# Altium PCB 400921.PcbDoc (part 1 of 3)
Units mm, origin at the board's own origin, x right, y up, seen from the top; angles counter-clockwise.
Board outline 33 x 32.99 mm, 4 copper layers (Top Layer, Mid-Layer 1, Mid-Layer 2, Bottom Layer), stack 0.75 mm thick; 113 components, 68 nets, 329 pads, 369 vias.
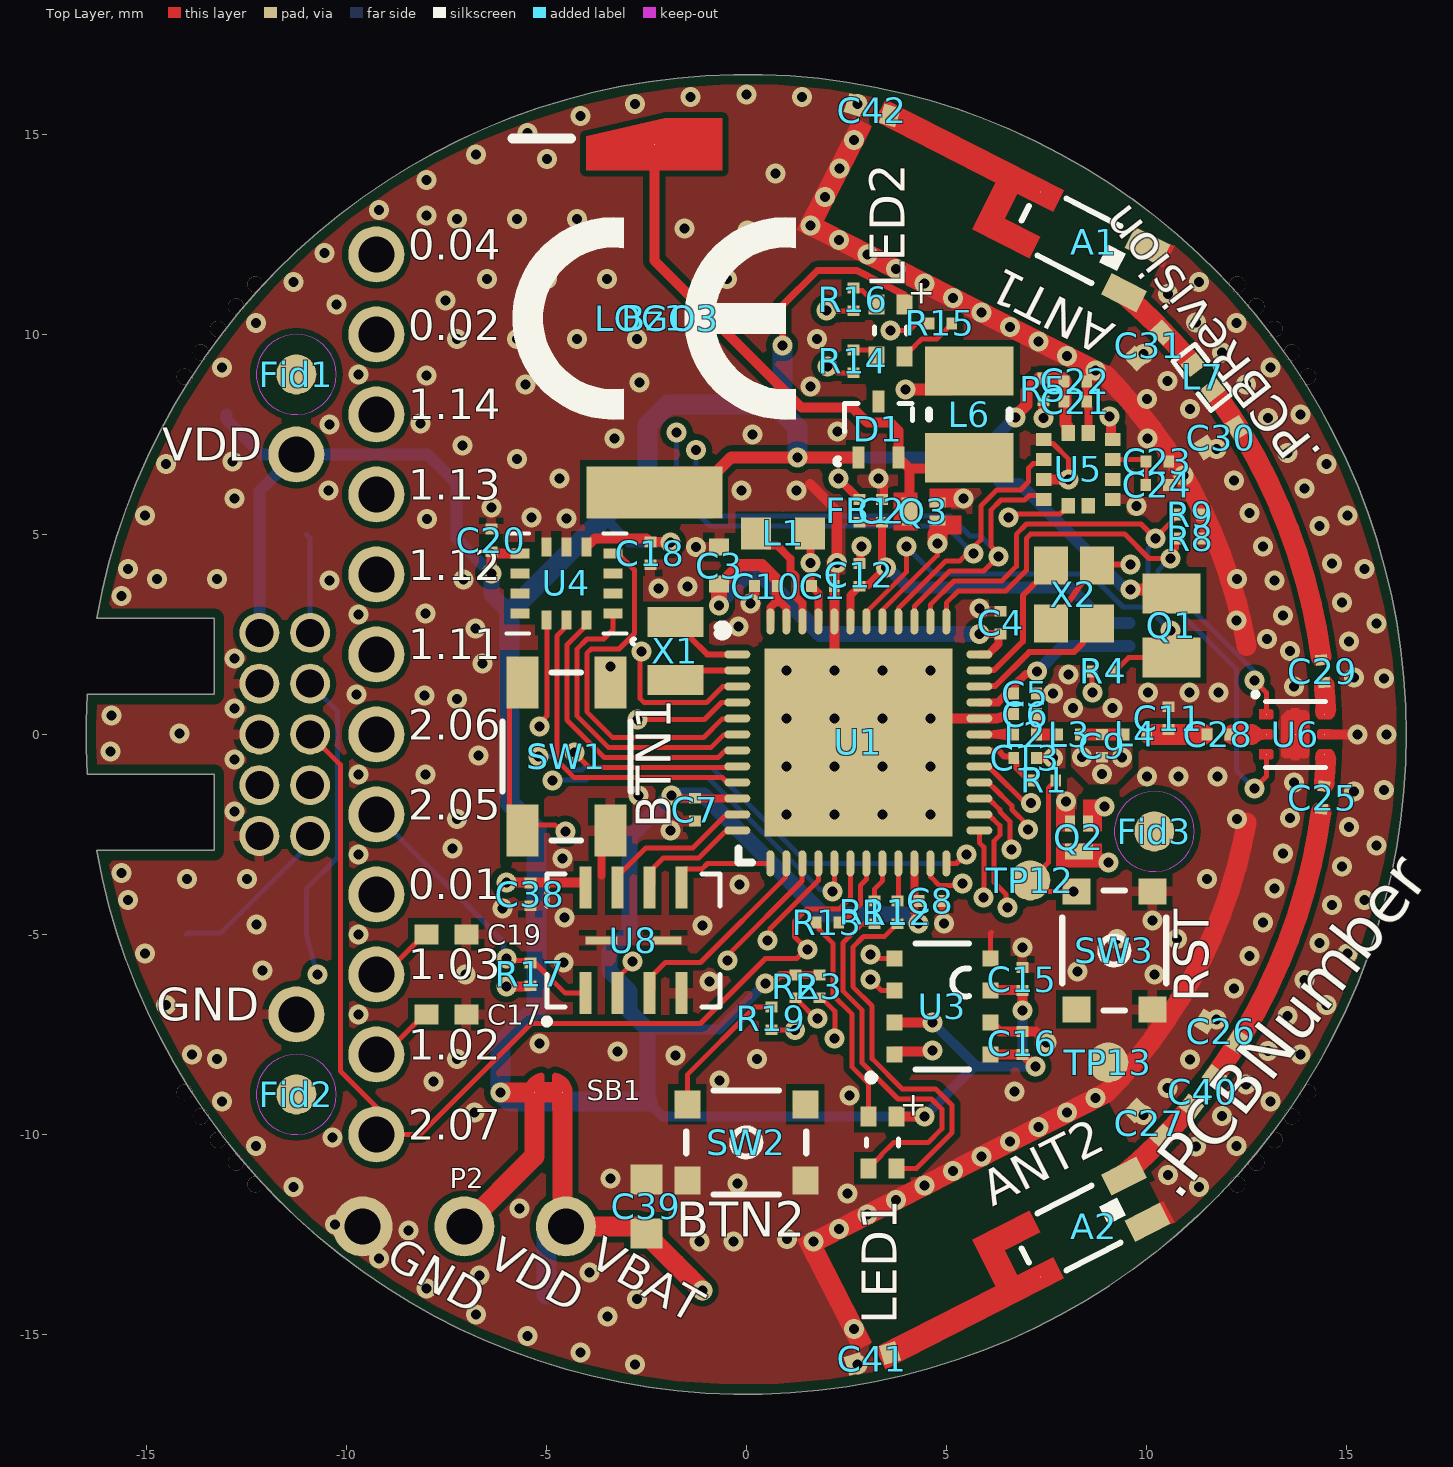
[diagram p0: Top Layer view]
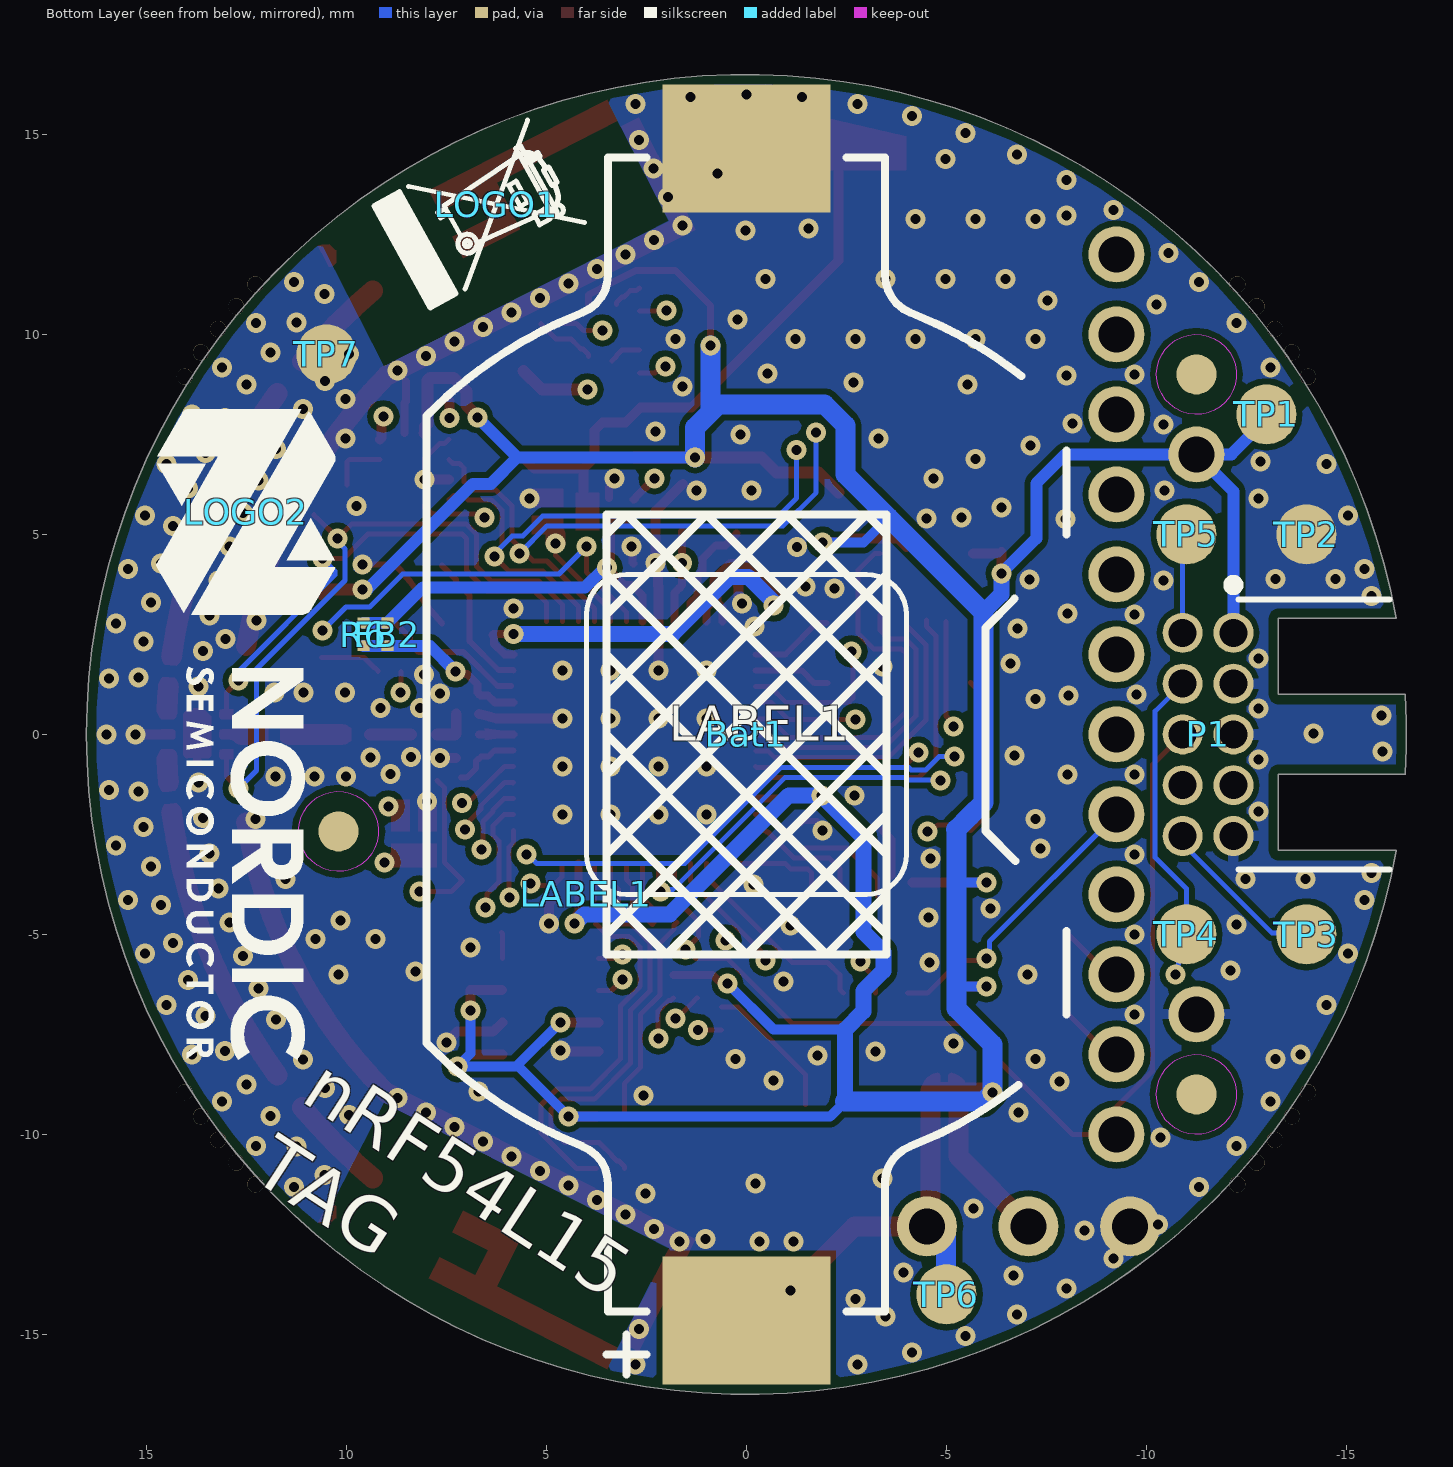
[diagram p1: Bottom Layer view, seen from below]
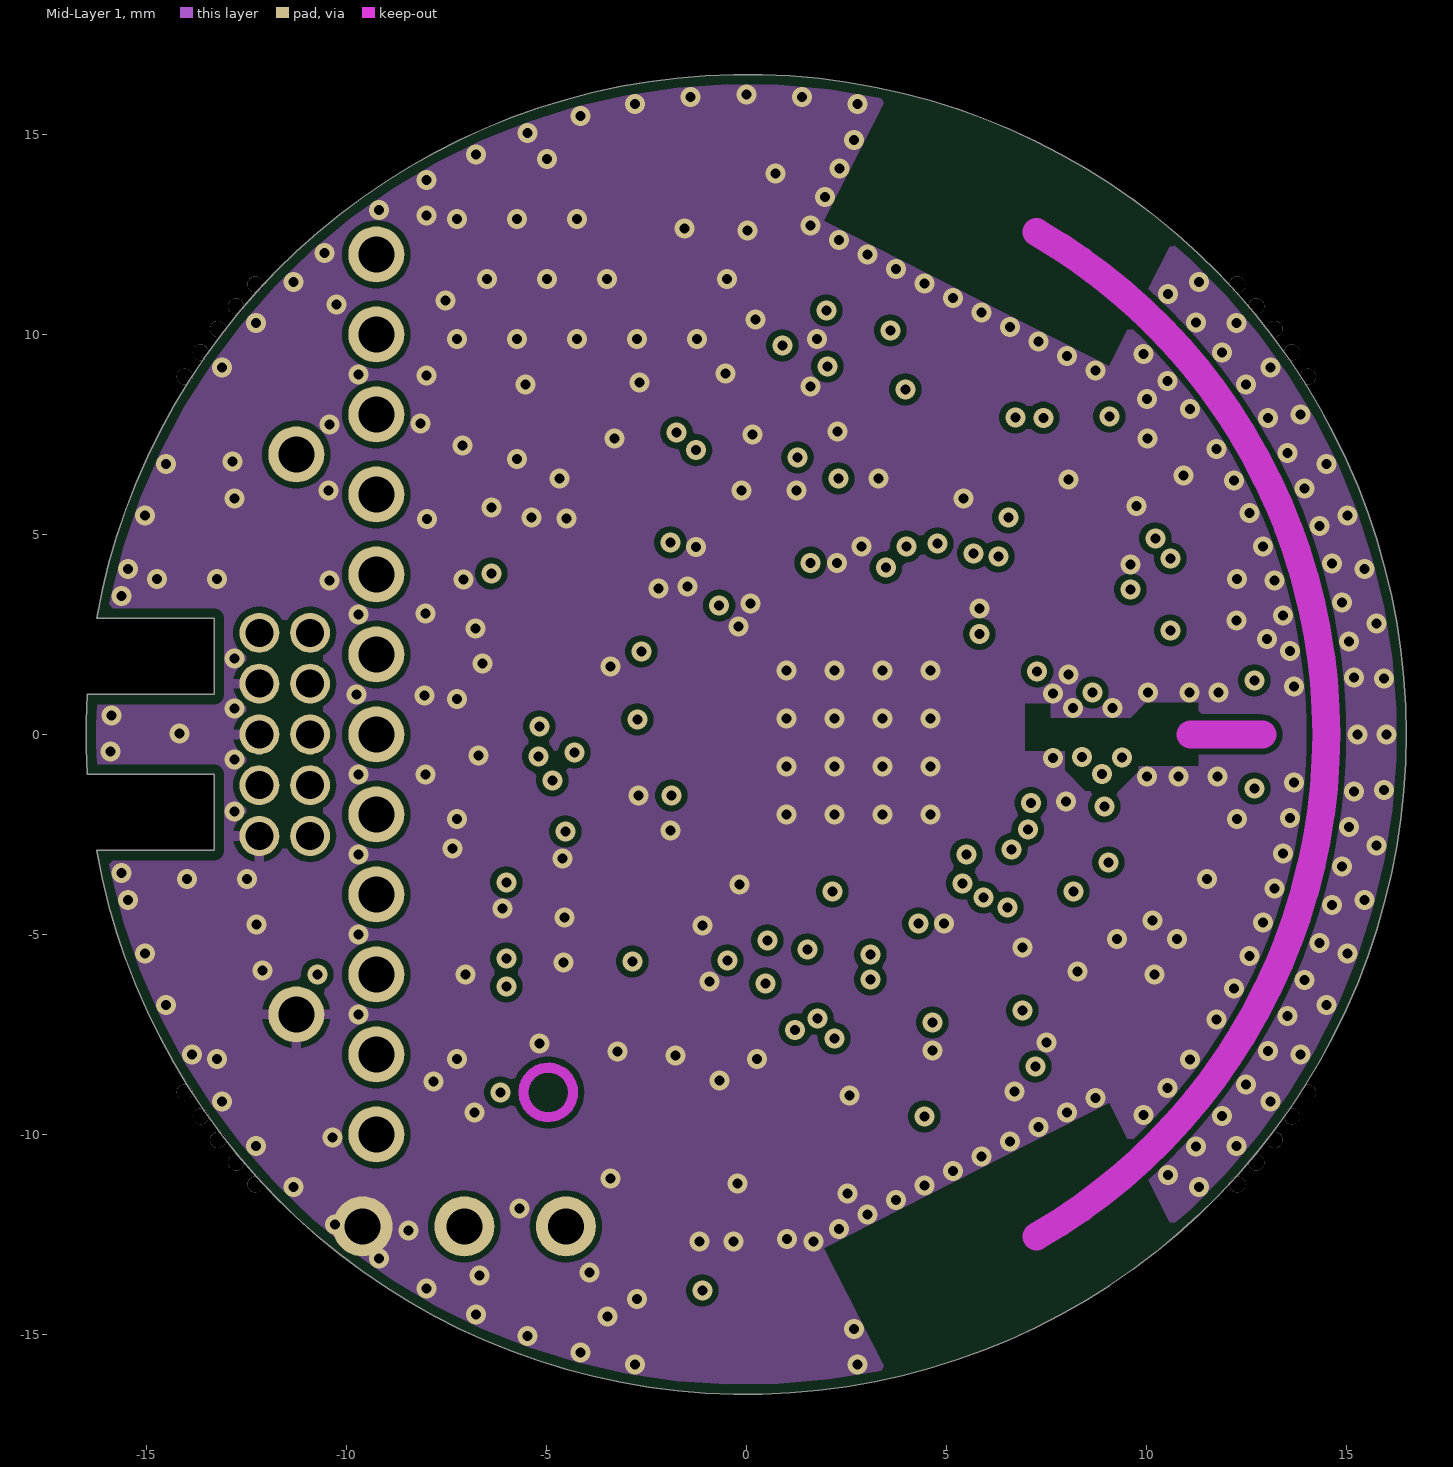
[diagram p2: Mid-Layer 1]
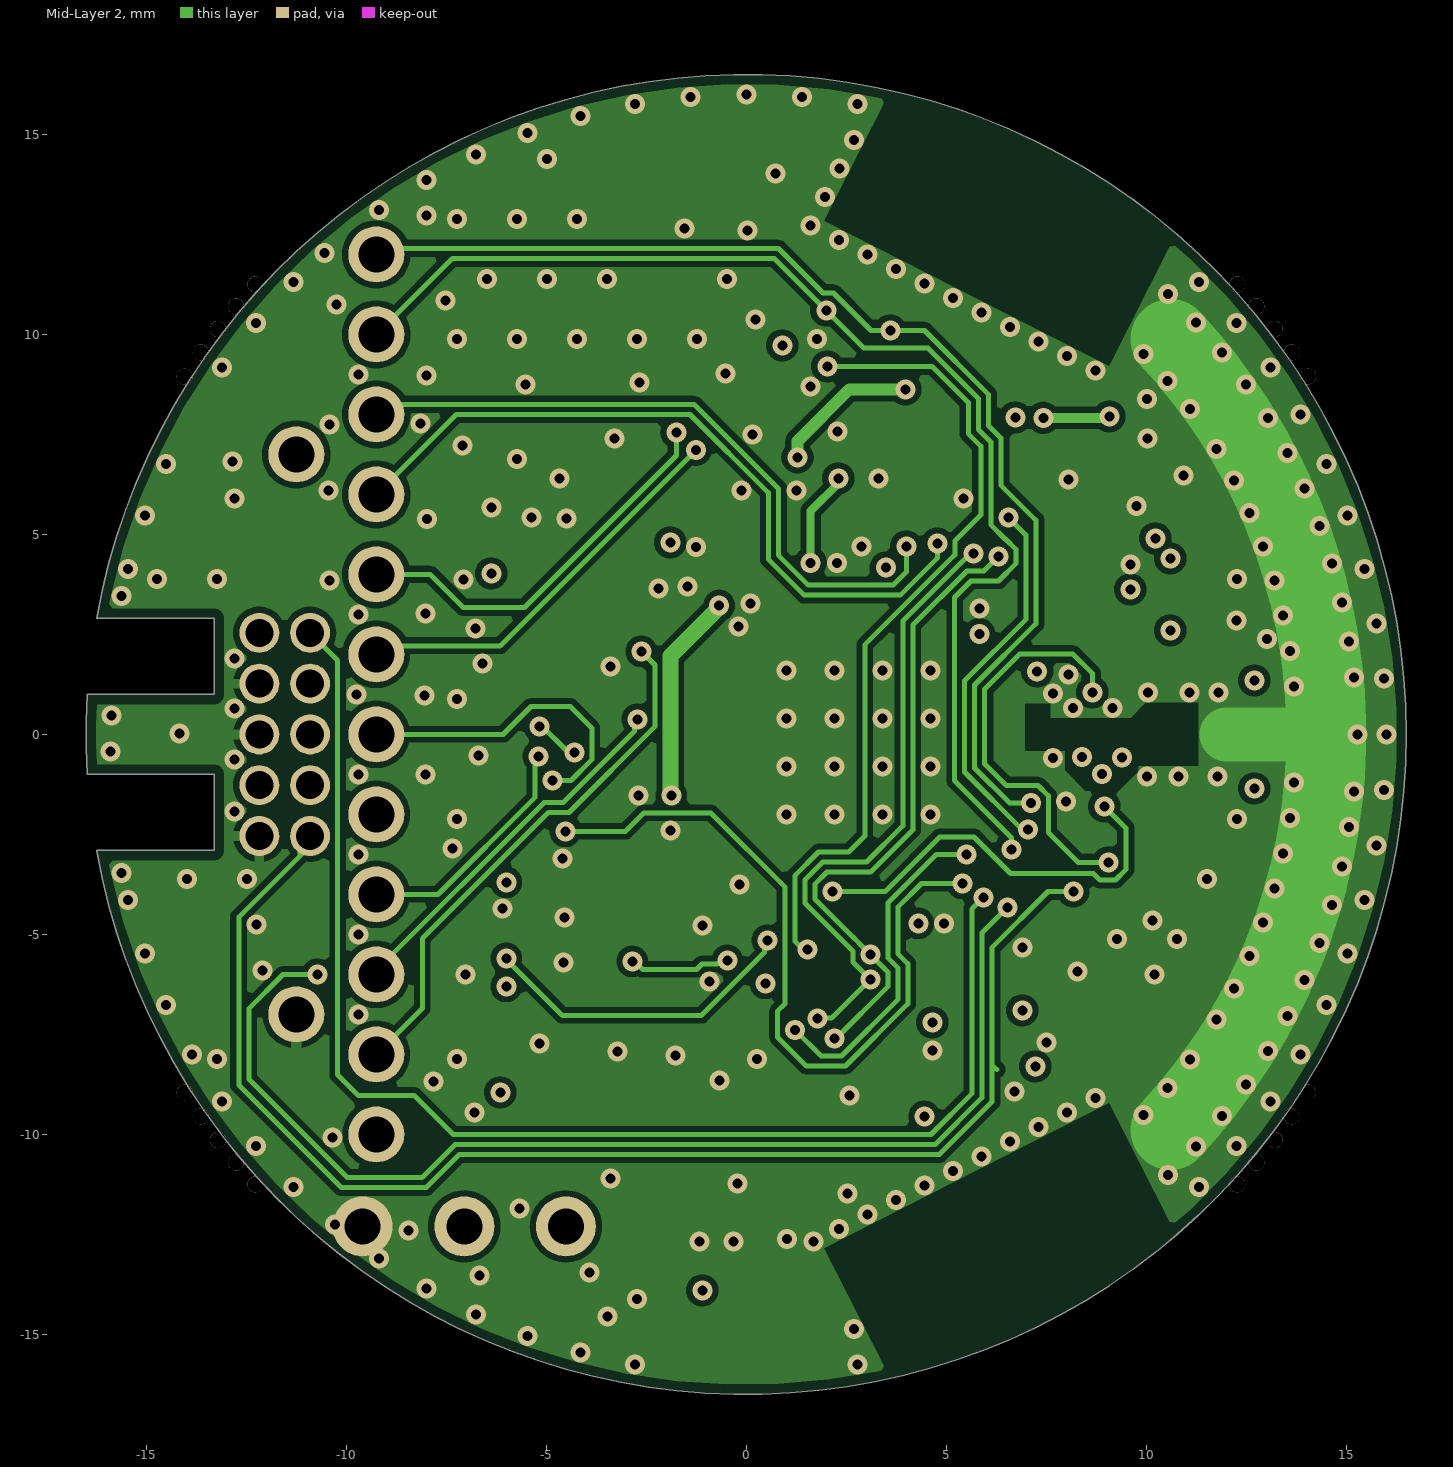
[diagram p3: Mid-Layer 2]

## Layer stack, top to bottom
Top Solder: solder mask 0.0304, Solder Resist Halogen-Free, Dk 3.8
Top Layer: signal copper 0.035
Dielectric1: prepreg 0.09, FR-4 Halogen-Free, Dk 4.2
Mid-Layer 1: signal copper 0.035
Dielectric2: core 0.43, FR-4 Halogen-Free, Dk 4.2
Mid-Layer 2: signal copper 0.035
Dielectric3: prepreg 0.09, FR-4 Halogen-Free, Dk 4.2
Bottom Layer: signal copper 0.035
Bottom Solder: solder mask 0.0304, Solder Resist Halogen-Free, Dk 3.8

## Board outline
-16.47,-1 -13.3,-1 -13.3,-2.9 -16.243,-2.9 ccw(c0,0) -16.243,2.9 -13.3,2.9 -13.3,1 -16.47,1 ccw(c-0.001,0)

## Design rules (kind name [scope] priority, off if disabled: settings)
BoardOutlineClearance BoardOutlineClearance_1 [HasFootprint('L-KLS5-CR2032-23-B1')] p1: gap=0.1 ignorepadtopadclearanceinfootprint=FALSE
BoardOutlineClearance [(OnLayer('Top Layer') OR OnLayer('Mid-Layer 1') OR OnLayer('Mid-Layer 2') OR OnLayer('Bottom Layer'))] p2: gap=0.25 ignorepadtopadclearanceinfootprint=FALSE except(0: Text-OutlineEdge Text-CavityEdge Text-CutoutEdge Text-SplitBarrior Text-SplitContinuation)
Clearance NPTH_Clearance [Not PadIsPlated And OnLayer('Multi-Layer')] p1: gap=0.175 ignorepadtopadclearanceinfootprint=FALSE
Clearance ANT_Clerance [InNet('ANT')] p2: gap=0.127 ignorepadtopadclearanceinfootprint=FALSE except(0: Arc-Hole Track-Hole SMDPad-Hole THPad-Hole Via-Hole Fill-Hole Poly-Hole Region-Hole Text-Hole)
Clearance Polygon_Clearance [(InNamedPolygon('Top_Layer-GND')) or (InNamedPolygon('Bottom_Layer-GND')) or (InNamedPolygon('Mid_Layer_1-GND')) or (InNamedPolygon('Mid_Layer_2-GND'))] p3: gap=0.15 ignorepadtopadclearanceinfootprint=FALSE
Clearance [All] p4: gap=0.125 ignorepadtopadclearanceinfootprint=FALSE
ComponentClearance [All] p1 off: gap=0.254 collisioncheckmode=3 verticalgap=0.254 showdistances=FALSE
DiffPairsRouting [All] p1: maxlimit=0.254 minlimit=0.15 mostfreqgap=0.254 toplayer_maxgap=0.15 toplayer_prefgap=0.15 toplayer_minwidth=0.381 toplayer_maxwidth=0.381 toplayer_prefwidth=0.381 midlayer1_mingap=0.254 midlayer1_minwidth=0.381 midlayer1_maxwidth=0.381 midlayer1_prefwidth=0.381 midlayer2_mingap=0.254 midlayer2_minwidth=0.381 midlayer2_maxwidth=0.381 midlayer2_prefwidth=0.381 bottomlayer_maxgap=0.15 bottomlayer_prefgap=0.15 bottomlayer_minwidth=0.381 bottomlayer_maxwidth=0.381 bottomlayer_prefwidth=0.381 maxuncoupledlength=12.7
FabricationTestPointUsage TestPointUsage [All] p1: valid=0 allowmultiple=FALSE
FabricationTestpoint Testpoint [All] p1: side=3 testpointundercomponent=TRUE minsize=1.016 maxsize=2.54 preferedsize=1.524 minholesize=0 maxholesize=1.016 preferedholesize=0.813 testpointgrid=0.025 allowsidetop=TRUE allowsidebottom=TRUE usegrid=TRUE gridtolerance=0
Height [All] p1 off: minheight=0 maxheight=25.4 prefheight=12.7
HoleSize [All] p1: absolutevalues=TRUE maxlimit=5 minlimit=0.25 maxpercent=80.000 minpercent=20.000
MinimumAnnularRing [All] p1 off: minimumring=0.152
PolygonConnect PolygonConnect_1 [isVia and innet(gnd)] p1: connectstyle=Direct reliefconductorwidth=0.254 reliefentries=4 polygonreliefangle="90 Angle" airgapwidth=0.254
PolygonConnect [All] p2: connectstyle=Relief reliefconductorwidth=0.254 reliefentries=4 polygonreliefangle="90 Angle" airgapwidth=0.15
RoutingVias [All] p1: holewidth=0.25 width=0.5 viastyle="Through Hole" minholewidth=0.2 minwidth=0.4 maxholewidth=0.711 maxwidth=1.27
SilkToSolderMaskClearance SilkscreenOverComponentPads [IsPad] p1: minsilkscreentomaskgap=0.254 clearancetoexposedcopper=TRUE
SolderMaskExpansion SolderMaskExpansion_via [IsVia] p1: expansion=0.076 istentingtop=TRUE
SolderMaskExpansion [All] p2: expansion=0.076 istentingtop=FALSE
SupplyNets "Schematic Supply Nets_9" [InNet('GND')] p1: voltage=0.000
Width Width_RF [InNetClass('RF')] p1: maxlimit=0.517 minlimit=0.076 preferedwidth=0.517 toplayer_minwidth=0.517 midlayer1_maxwidth=0.076 midlayer1_prefwidth=0.078 midlayer2_maxwidth=0.076 midlayer2_prefwidth=0.078 bottomlayer_minwidth=0.517 impedanceprofiledriven=TRUE impedanceprofileid={737E912B-4C07-4FB1-81E6-55882BF422C1} impedanceprofilevalue=50.000000 minimp=50.000000 maximp=50.000000 favimp=50.000000
Width [All] p2: maxlimit=2.54 minlimit=0.125 preferedwidth=0.15
23 further rules are at their usual default settings.

## Classes and differential pairs
net class GPIO: P0.00 P0.01 P0.02 P0.04 P2.07 P2.08 P2.09 P2.10
component class Sensors: C15 C16 C18 C20 C21 C22 C23 C24 Q1 Q2 R2 R3 R4 R5 U3 U4 U5
component class RFFE: A1 A2 C25 C26 C27 C28 C29 C30 C31 C40 C41 C42 L7 R7 R8 R9 U6
component class nRF54L15: 0.01 0.02 0.04 1.02 1.03 1.11 1.12 1.13 1.14 2.05 2.06 2.07 C1 C2 C3 C4 C5 C6 C7 C8 C9 C10 C11 C12 C13 C17 C19 FB1 FB2 GND L1 L2 L3 L4 R1 R6 TP1 TP2 TP3 TP4 TP5 U1 VDD X1 X2
component class Misc: Bat1 Bz1 C38 C39 D1 L6 LED1 LED2 P1 P2 Q3 R11 R12 R13 R14 R15 R16 R17 R19 SB1 SW1 SW2 SW3 TP6 TP7 TP12 TP13 U8
net class SWD_nRF54: P2.07 RESET SWDCLK SWDIO
net class RF: ANT1 ANT2 J1 J2 NetA1_1 NetA2_1 RF RFC
net class QSPI: P2.00 P2.01 P2.02 P2.03 P2.04 P2.05

## Components (designator, comment, footprint, x,y, rotation, side; value= is the part's Value field where it differs from the comment)
0.01 "TP" TESTPAD-TH -9.25,-4 r270 top
0.02 "TP" TESTPAD-TH -9.25,10 r270 top
0.04 "TP" TESTPAD-TH -9.25,12 r270 top
1.02 "TP" TESTPAD-TH -9.25,-8 r270 top
1.03 "TP" TESTPAD-TH -9.25,-6 r270 top
1.11 "TP" TESTPAD-TH -9.25,2 r270 top
1.12 "TP" TESTPAD-TH -9.25,4 r270 top
1.13 "TP" TESTPAD-TH -9.25,6 r270 top
1.14 "TP" TESTPAD-TH -9.25,8 r270 top
2.05 "TP" TESTPAD-TH -9.25,-2 r270 top
2.06 "TP" TESTPAD-TH -9.25,0 r270 top
2.07 "TP" TESTPAD-TH -9.25,-10 r270 top
A1 "2450AT18D0100" 2450AT18D0100_TE-R 8.4,12.3 r333 top
A2 "2450AT18D0100" 2450AT18D0100_TE-L 8.4,-12.3 r207 top
Bat1 "Bat Holder CR2032" L-KLS5-CR2032-23-B1 0,0 r90 bottom locked
Bz1 "Piezo_4kHz" Buzzer_PKMCS0909 -2.3,10.4 r90 top
C1 "2.2µF" CAPC0603X03L_C 1.915,3.709 r180 top
C2 "2.2µF" CAPC0603X03L_C 3.388,5.587 r270 top
C3 "10µF" CAPC1005X04L_C2 -0.677,4.223 r270 top
C4 "100nF" CAPC0603X03L_C 6.358,2.793 r90 top
C5 "100pF" CAPC0603X03L_C 6.968,1.019 r180 top
C6 "1.5pF" CAPC0603X03L_C 6.968,0.507 r0 top
C7 "100nF" CAPC0603X03L_C -1.287,-1.881 r270 top
C8 "100nF" CAPC0603X03L_C 4.604,-4.162 r0 top
C9 "2.0pF" CAPC0603X03L_C 8.898,-0.286 r90 top
C10 "100nF" CAPC0603X03L_C 0.491,3.707 r180 top
C11 "0.3pF" CAPC0603X03L_C 10.549,0.405 r270 top
C12 "18pF" CAPC0603X03L_C 2.828,3.987 r270 top
C13 "3.9pF" CAPC0603X03L_C 6.973,-0.586 r180 top
C15 "100nF" CAPC0603X03L_C 6.9,-6.115 r270 top
C16 "100nF" CAPC0603X03L_C 6.9,-7.715 r270 top
C17 "TBD" CAPC1005X04L -7.5,-7 r0 top
C18 "100nF" CAPC0603X03L_C -2.4,4.525 r90 top
C19 "TBD" CAPC1005X04L -7.5,-5 r0 top
C20 "100nF" CAPC0603X03L_C -6.375,4.85 r270 top
C21 "100nF" CAPC0603X03L_C 8.225,8.325 r180 top
C22 "100nF" CAPC0603X03L_C 8.225,8.825 r180 top
C23 "100nF" CAPC0603X03L_C 10.275,6.825 r180 top
C24 "100nF" CAPC0603X03L_C 10.273,6.24 r180 top
C25 "47pF" CAPC0603X03L_C 14.414,-1.579 r83.75 top
C26 "0.8pF" CAPC1005X04L_C2 11.873,-7.419 r328 top
C27 "N.C." CAPC1005X04L_C2 10.071,-9.725 r316 top
C28 "47pF" CAPC0603X03L_C 11.8,0 r180 top
C29 "47pF" CAPC0603X03L_C 14.414,1.579 r276.25 top
C30 "1.2pF" CAPC1005X04L_C2 11.873,7.419 r32 top
C31 "N.C." CAPC1005X04L_C2 10.071,9.725 r44 top
C38 "100nF" CAPC0603X03L_C -5.4,-4 r270 top
C39 "47µF" CAPC1608X06L -2.5,-11.8 r270 top
C40 "6.8pF" CAPC1005X04L_C2 11.416,-8.927 r232 top
C41 "2.0pF" CAPC1005X04L_C2 3.149,-15.603 r17 top
C42 "1.5pF" CAPC1005X04L_C2 3.149,15.603 r343 top
D1 "BZB984-C12,115" SOTFL50P160X60-3L 3.3,7.625 r90 top
FB1 "120R/0.2A" INDC0603X03L_C 2.828,5.587 r270 top
FB2 "120R/0.2A" INDC0603X03L_C 8.975,2.5 r90 bottom
Fid1 "Fiducial mark" Fiducial -11.25,9 r180 top value=N.A.
Fid2 "Fiducial mark" Fiducial -11.25,-9 r180 top value=N.A.
Fid3 "Fiducial mark" Fiducial 10.2,-2.425 r180 top value=N.A.
GND "TP" TESTPAD-TH -11.25,-7 r270 top
L1 "4.7µH" INDC1608X06L 0.923,5.028 r0 top
L2 "2.7nH" INDC0603X03L_C 6.968,-0.001 r0 top
L3 "3.5nH" INDC0603X03L_C 8.07,-0.001 r0 top
L4 "3.5nH" INDC0603X03L_C 9.726,-0.001 r0 top
L6 "1.0mH" INDC2520X10N 5.575,8 r90 top
L7 "2.7nH" INDC1005X04L_C2 11.416,8.927 r128 top
LABEL1 "8x8mm" LabelSilk_8x8 4,-4 r180 bottom
LED1 "LED RGB" LED_RGB_0603 3.4,-10.2 r180 top
LED2 "LED RGB" LED_RGB_0603 3.6,10.1 r180 top
LOGO1 "WEE Symbol" WEEE_3x4.5mm 6.25,13.25 r241 bottom
LOGO2 "Nordic Logo" NORDIC_LOGO_LYING 12.512,5.563 r270 bottom
LOGO3 "CE Logo" CE_logo -2.241,10.4 r0 top
P1 "Socket 2x5, Angled" SOCKET_ANG_2x5_TH-1.27mm -14.45,0 r90 bottom
P2 "Pin List 1x3" LIST_1x3-NC -7.05,-12.3 r180 top
Q1 "TEMT6200FX01" TEMT6200FX01 10.625,2.725 r90 top
Q2 "RV2C010UNT2L" DFN65P100X40-3L 8.312,-2.575 r270 top
Q3 "RV2C010UNT2L" DFN65P100X40-3L 4.425,5.575 r180 top
R1 "1k" RESC0603X03L_C 7.451,-1.152 r0 top
R2 "10k" RESC0603X03L_C 1.225,-6.3 r90 top
R3 "10k" RESC0603X03L_C 1.825,-6.3 r90 top
R4 "2k7" RESC0603X03L_C 8.925,1.575 r0 top
R5 "10R" RESC0603X03L_C 7.425,8.625 r270 top
R6 "4R7" RESC0603X03L_C 9.575,2.5 r90 bottom
R8 "1M0" RESC0603X03L_C 11.1,4.9 r180 top
R9 "1M0" RESC0603X03L_C 11.1,5.5 r180 top
R11 "390R" RESC0603X03L_C 3.2,-4.45 r270 top
R12 "2k2" RESC0603X03L_C 3.775,-4.45 r270 top
R13 "1k2" RESC0603X03L_C 2.025,-4.7 r180 top
R14 "390R" RESC0603X03L_C 2.675,9.325 r90 top
R15 "2k2" RESC0603X03L_C 4.85,10.275 r0 top
R16 "1k2" RESC0603X03L_C 2.675,10.875 r90 top
R17 "100k" RESC0603X03L_C -5.4,-6 r270 top
R19 "0R" RESC0603X03L_C 0.625,-7.1 r270 top
SB1 "Solderbridge" Solderbridge_Shorted_Power -4.95,-8.95 r180 top net-tie
SW1 "PB SW" KLS-TS3402 -4.5,-0.55 r270 top locked
SW2 "PB SW" SW_TACTILE_2.6x3.0MM_4-LEAD 0,-10.2 r0 top
SW3 "PB SW" SW_TACTILE_2.6x3.0MM_4-LEAD 9.2,-5.4 r270 top
TP1 "Ø1.5mm,SMD" TP_SMD_D1.5mm -13,8 r270 bottom
TP2 "Ø1.5mm,SMD" TP_SMD_D1.5mm -14,5 r180 bottom
TP3 "Ø1.5mm,SMD" TP_SMD_D1.5mm -14,-5 r180 bottom
TP4 "Ø1.5mm,SMD" TP_SMD_D1.5mm -11,-5 r180 bottom
TP5 "Ø1.5mm,SMD" TP_SMD_D1.5mm -11,5 r180 bottom
TP6 "Ø1.5mm,SMD" TP_SMD_D1.5mm -5,-14 r180 bottom
TP7 "Ø1.5mm,SMD" TP_SMD_D1.5mm 10.5,9.5 r180 bottom
TP12 "Ø1.0mm,SMD" TP_SMD_D1.0mm 7.1,-3.65 r0 top
TP13 "Ø1.0mm,SMD" TP_SMD_D1.0mm 9.05,-8.2 r0 top
U1 "nRF54L15-QFAA-C00" QFN40P600X600X90-48N 2.8,-0.2 r0 top
U3 "BME688" BME680 4.9,-6.8 r180 top
U4 "BMI270" BMI270 -4.5,3.775 r180 top
U5 "ADXL367" LGA50P220X230X97-12N 8.3,6.625 r0 top
U6 "SKY13348-374LF" SON50P150X50_HS-7N 13.725,0 r0 top
U8 "MX25R6435F" SON80P300X60_HS-9N -2.825,-5.15 r90 top
VDD "TP" TESTPAD-TH -11.25,7 r270 top
X1 "32.768kHz" XTAL_2012 -1.774,2.08 r90 top
X2 "32MHz" BT-XTAL_2016 8.187,3.504 r90 top

## Footprints (in the part's own frame and the unit in brackets; to place one, negate y for a bottom-side part, rotate by r counter-clockwise, add the part's x,y. Pads: shape width x height; smd on the part's side, far side on the other; paste and mask are expansions set on the pad)
2450AT18D0100_TE-L [mm] "2450MHz Antenna"
  rect 1x0.6 smd mask+0.05: 1(-1.5,-0.65) 2(-1.5,0.65)
  round 0.025 smd paste-5 mask+0.051: 3(1.5,0.65)
  Top Layer region: 6,0.95 1,0.95 1,0.35 2,0.35 2,-0.35 1,-0.35 1,-0.95 2.6,-0.95 2.6,0.35 6,0.35
  Multi-Layer pour cut-out: -2,-2.45 -2,1.5 6,1.5 6,-2.45
  silkscreen extent -1.1,-0.8 1.6,0.8, body extent -1.61,-0.81 1.61,0.81, height 1.2
2450AT18D0100_TE-R [mm] "2450MHz Antenna"
  rect 1x0.6 smd mask+0.05: 1(1.5,-0.65) 2(1.5,0.65)
  round 0.025 smd paste-5 mask+0.051: 3(-1.5,0.65)
  Top Layer region: -6,0.95 -1,0.95 -1,0.35 -2,0.35 -2,-0.35 -1,-0.35 -1,-0.95 -2.6,-0.95 -2.6,0.35 -6,0.35
  Multi-Layer pour cut-out: 2,-2.45 2,1.5 -6,1.5 -6,-2.45
  silkscreen extent -1.6,-0.8 1.1,0.8, body extent -1.61,-0.81 1.61,0.81, height 1.2
BME680 [mm]
  rect 0.4x0.4 smd mask+0.1: 1(1.2,1.2) 2(1.2,0.4) 3(1.2,-0.4) 4(1.2,-1.2) 5(-1.2,-1.2) 6(-1.2,-0.4) 7(-1.2,0.4) 8(-1.2,1.2)
  silkscreen extent -0.67,-1.58 1.82,1.82, body extent -1.5,-1.5 1.5,1.5, height 0.93
BMI270 [mm] "Description 6-axis, smart, low-power, inertial measurement unit"
  rect 0.475x0.25 smd: 1(-1.163,0.75) 2(-1.162,0.25) 3(-1.162,-0.25) 4(-1.162,-0.75) 8(1.162,-0.75) 9(1.162,-0.25) 10(1.162,0.25) 11(1.162,0.75)
  rect 0.25x0.475 smd: 5(-0.5,-0.913) 6(0,-0.913) 7(0.5,-0.913) 12(0.5,0.912) 13(0,0.912) 14(-0.5,0.912)
  silkscreen extent -1.71,-1.25 1.5,1.51, body extent -1.5,-1.25 1.5,1.25, height 0.7
BT-XTAL_2016 [mm] "Crystal 2.0 x 1.6 mm"
  rect 0.95x0.85 smd: 1(-0.725,-0.575) 2(0.725,-0.575) 3(0.725,0.575) 4(-0.725,0.575)
  body extent -1.05,-0.85 1.05,0.85, height 0.56
Buzzer_PKMCS0909 [mm]
  rect 1.3x3.4 smd: 1(-4.35,0)
  round 0.025 smd: 2(4.35,0)
  Top Layer region: 3.7,1.7 3.7,-1.7 5,-1.7 5,-0.25 4.55,1.7
  silkscreen extent 4.5,2.08 4.5,3.55, body extent -4.5,-4.5 4.5,4.5, height 1.9
CAPC0603X03L_C [mm] "Chip Capacitor, 2-Leads, Body 0.6x0.3mm, IPC High Density"
  rect 0.27x0.3 smd mask+0.05: 1(-0.285,0) 2(0.285,0)
  body extent -0.3,-0.15 0.3,0.15, height 0.3
CAPC1005X04L [mm] "Chip Capacitor, 2-Leads, Body 1.0x0.5mm, IPC High Density"
  rect 0.6x0.5 smd: 1(-0.5,0) 2(0.5,0)
  body extent -0.5,-0.25 0.5,0.25, height 0.5
CAPC1005X04L_C2 [mm] "Chip Capacitor, 2-Leads, Body 1.0x0.5mm, IPC High Density"
  rect 0.425x0.5 smd mask+0.05: 1(-0.463,0) 2(0.463,0)
  body extent -0.5,-0.25 0.5,0.25, height 0.5
CAPC1608X06L [mm] "Chip Capacitor, 2-Leads, Body 1.6x0.8mm, IPC High Density"
  rect 0.75x0.8 smd: 1(-0.675,0) 2(0.675,0)
  body extent -0.8,-0.4 0.8,0.4, height 0.8
CE_logo [mm]
  silkscreen extent -3.6,-2.53 3.48,2.53
DFN65P100X40-3L [mm] "DFN, 3-Leads, Body 0.60x1.00mm, Pitch 0.65mm, IPC High Density"
  rect 0.4x0.25 smd mask+0.05: 1(-0.35,0.225) 2(-0.35,-0.225)
  rect 0.4x0.7 smd mask+0.065: 3(0.35,0)
  body extent -0.53,-0.32 0.53,0.32, height 0.4
Fiducial [mm] "Fiducial Mark"
  round 1 smd paste-2539.97 mask+0.5: 0(0,0)
  round 1 smd far side paste-2539.97 mask+0.5: 0(0,0)
  Top Layer keep-out circle w0.01: c0,0 r1
  Bottom Layer keep-out circle w0.01: c0,0 r1
INDC0603X03L_C [mm] "Chip Inductor, 2-Leads, Body 0.6x0.3mm, IPC High Density"
  rect 0.27x0.3 smd: 1(-0.285,0) 2(0.285,0)
  body extent -0.3,-0.15 0.3,0.15, height 0.3
INDC1005X04L_C2 [mm] "Chip Inductor, 2-Leads, Body 1.0x0.5mm, IPC High Density"
  rect 0.4x0.5 smd mask+0.05: 1(-0.4,0) 2(0.4,0)
  silkscreen extent -0.78,-0.35 0.77,0.35, body extent -0.5,-0.25 0.5,0.25, height 0.5
INDC1608X06L [mm] "Chip Inductor, 2-Leads, Body 1.6x0.8mm, IPC High Density"
  rect 0.75x0.8 smd: 1(-0.675,0) 2(0.675,0)
  body extent -0.8,-0.4 0.8,0.4, height 0.8
INDC2520X10N [mm] "Chip Inductor, 2-Leads, Body 2,50x2,00mm, IPC Medium Density"
  rect 1.23x2.22 smd: 1(-1.085,0) 2(1.085,0)
  silkscreen extent -0.1,-1.01 0.1,1.01, body extent -1.25,-1 1.25,1, height 1.2
KLS-TS3402 [mm] "Microminiature SMT Top Actuated"
  rect 1.3x0.8 smd: 1(-1.85,1.1) 1(1.85,1.1) 2(-1.85,-1.1) 2(1.85,-1.1)
  silkscreen extent -2.1,-1.6 2.1,1.6, body extent -2.29,-1.6 2.29,1.6, height 2.5
L-KLS5-CR2032-23-B1 [mm] "SMT,CR2032 Coin Battery Holder"
  rect 3.2x4.2 smd: 1(-14.65,0) 2(14.65,0)
  silkscreen extent -16,-8 14.42,8, body extent -15.7,-8 15.85,8, height 5.17
LabelSilk_8x8 [mm] "PCA version label, stick-on, 8mmx8mm"
  silkscreen extent 0,0 8,8, body extent 0,0 8,8, height 0.05
LED_RGB_0603 [mm]
  rect 0.4x0.5 smd paste+0: 1(0.35,-0.65) 2(-0.35,0.65) 3(0.35,0.65) 4(-0.35,-0.65)
  silkscreen extent -0.4,-0.08 0.4,0.08, body extent -0.4,-0.8 0.4,0.8, height 0.5
LGA50P220X230X97-12N [mm] "LGA, 12-Leads, Body 2,20x2,30mm, Pitch 0,50mm, IPC Medium Density"
  rect 0.39x0.33 smd mask+0.05: 1(-0.86,0.75) 2(-0.86,0.25) 3(-0.86,-0.25) 4(-0.86,-0.75) 7(0.86,-0.75) 8(0.86,-0.25) 9(0.86,0.25) 10(0.86,0.75)
  rect 0.33x0.39 smd mask+0.05: 5(-0.25,-0.91) 6(0.25,-0.91) 11(0.25,0.91) 12(-0.25,0.91)
  body extent -1.15,-1.2 1.15,1.2, height 0.97
LIST_1x3-NC [mm] "Pin List, 2.54mm through hole"
  round 1.5 hole 0.9: 1(-2.54,0) 2(0,0) 3(2.54,0)
NORDIC_LOGO_LYING [mm]
  silkscreen extent -2.57,-2.24 13.7,2.24
QFN40P600X600X90-48N [mm] "QFN, 48-Leads, Body 6,0x6,0mm (max), Pitch 0,40mm, IPC Medium Density"
  oval 0.65x0.2 smd: 1(-3.025,2.2) 2(-3.025,1.8) 3(-3.025,1.4) 4(-3.025,1) 5(-3.025,0.6) 6(-3.025,0.2) 7(-3.025,-0.2) 8(-3.025,-0.6) 9(-3.025,-1) 10(-3.025,-1.4) 11(-3.025,-1.8) 12(-3.025,-2.2) 25(3.025,-2.2) 26(3.025,-1.8) 27(3.025,-1.4) 28(3.025,-1) 29(3.025,-0.6) 30(3.025,-0.2) 31(3.025,0.2) 32(3.025,0.6) 33(3.025,1) 34(3.025,1.4) 35(3.025,1.8) 36(3.025,2.2)
  oval 0.2x0.65 smd: 13(-2.2,-3.025) 14(-1.8,-3.025) 15(-1.4,-3.025) 16(-1,-3.025) 17(-0.6,-3.025) 18(-0.2,-3.025) 19(0.2,-3.025) 20(0.6,-3.025) 21(1,-3.025) 22(1.4,-3.025) 23(1.8,-3.025) 24(2.2,-3.025) 37(2.2,3.025) 38(1.8,3.025) 39(1.4,3.025) 40(1,3.025) 41(0.6,3.025) 42(0.2,3.025) 43(-0.2,3.025) 44(-0.6,3.025) 45(-1,3.025) 46(-1.4,3.025) 47(-1.8,3.025) 48(-2.2,3.025)
  rect 4.7x4.7 smd: 49(0,0)
  silkscreen extent -3.49,-3 -2.65,2.92, body extent -3.02,-3.02 3.02,3.02, height 0.86
RESC0603X03L_C [mm] "Chip Resistor, 2-Leads, Body 0.6x0.3mm, IPC High Density"
  rect 0.27x0.3 smd: 1(-0.285,0) 2(0.285,0)
  body extent -0.3,-0.15 0.3,0.15, height 0.23
SOCKET_ANG_2x5_TH-1.27mm [mm] "CONN SOCKET RIGHT ANGLE DUAL 10POS - SOCKET, PCB, 0.05\", 5+5WAY"
  round 1 hole 0.7 paste-2539.97: 1(2.54,2.275) 2(2.54,3.545) 3(1.27,2.275) 4(1.27,3.545) 5(0,2.275) 6(0,3.545) 7(-1.27,2.275) 8(-1.27,3.545) 9(-2.54,2.275) 10(-2.54,3.545)
  silkscreen extent -3.37,-1.63 3.86,2.4, body extent -3.37,-2.15 3.37,3.62, height 3.1
Solderbridge_Shorted_Power [mil]
  round 1 smd paste-99999: 1(-13.84,0.21) 2(13.72,0.21)
  Top Layer region: -4.92,9.84 4.92,9.84 4.92,-9.84 -4.92,-9.84
  Top Layer region: -7.54,19.57 -15.82,15.94 -21.61,9 -23.68,0.21 -23.68,0.21 -21.61,-8.59 -15.82,-15.53 -7.54,-19.16 -7.54,-19.16 -6.24,-19.11 -5.08,-18.51 -4.28,-17.47 -4,-16.2 -3.99,-16.2 -3.99,16.61 -4.28,17.89 -5.08,18.92 -6.24,19.52 -7.54,19.57
  Top Layer region: 7.43,-19.16 15.71,-15.53 21.49,-8.59 23.56,0.21 23.56,0.21 21.49,9 15.71,15.94 7.43,19.57 7.43,19.57 6.12,19.52 4.96,18.92 4.16,17.89 3.88,16.61 3.88,16.61 3.88,-16.2 4.16,-17.47 4.96,-18.51 6.12,-19.11 7.43,-19.16
SON50P150X50_HS-7N [mil] "SON, 6-Leads, Body 1,50x1,50mm, Pitch 0,50mm, Thermal Pad 1,20x0,58mm, IPC Medium Density"
  round 1 smd mask+1.97: 1(-28.54,19.69) 2(-28.54,0) 3(-28.54,-19.69) 4(28.54,-19.69) 5(28.54,0) 6(28.54,19.69) 7(0,0)
  Top Layer region: 9.64,-23.62 3.94,-23.62 3.94,-25.62 -3.94,-25.59 -3.94,-23.62 -9.65,-23.62 -11.23,-23.31 -12.57,-22.41 -13.47,-21.07 -13.78,-19.49 -13.78,-19.49 -13.78,17.81 -7.77,23.62 -3.94,23.62 -3.94,25.59 3.94,25.59 3.94,23.62 9.65,23.62 11.23,23.31 12.57,22.41 13.47,21.07 13.78,19.49 13.78,19.49 13.78,-19.49 13.47,-21.07 12.57,-22.41 11.23,-23.31 9.64,-23.62
  Top Layer region: -35.43,14.76 -35.43,24.61 -24.11,24.61 -23.17,24.42 -22.37,23.89 -21.84,23.09 -21.65,22.15 -21.65,22.15 -21.65,17.22 -21.84,16.28 -22.37,15.48 -23.17,14.95 -24.11,14.76 -24.11,14.76
  Top Layer region: -35.43,-4.92 -35.43,4.92 -24.11,4.92 -23.17,4.73 -22.37,4.2 -21.84,3.4 -21.65,2.46 -21.65,2.46 -21.65,-2.46 -21.84,-3.4 -22.37,-4.2 -23.17,-4.73 -24.11,-4.92 -24.11,-4.92
  Top Layer region: -35.43,-24.61 -35.43,-14.76 -24.11,-14.76 -23.17,-14.95 -22.37,-15.48 -21.84,-16.28 -21.65,-17.22 -21.65,-17.22 -21.65,-22.15 -21.84,-23.09 -22.37,-23.89 -23.17,-24.42 -24.11,-24.61 -24.11,-24.61
  Top Layer region: 35.43,24.61 35.43,14.76 24.11,14.76 23.17,14.95 22.37,15.48 21.84,16.28 21.65,17.22 21.65,17.22 21.65,22.15 21.84,23.09 22.37,23.89 23.17,24.42 24.11,24.61 24.11,24.61
  Top Layer region: 35.43,4.92 35.43,-4.92 24.11,-4.92 23.17,-4.73 22.37,-4.2 21.84,-3.4 21.65,-2.46 21.65,-2.46 21.65,2.46 21.84,3.4 22.37,4.2 23.17,4.73 24.11,4.92 24.11,4.92
  Top Layer region: 35.43,-14.76 35.43,-24.61 24.11,-24.61 23.17,-24.42 22.37,-23.89 21.84,-23.09 21.65,-22.15 21.65,-22.15 21.65,-17.22 21.84,-16.28 22.37,-15.48 23.17,-14.95 24.11,-14.76 24.11,-14.76
  silkscreen extent -41,-32 30,41, body extent -30,-30 30,30, height 20
SON80P300X60_HS-9N [mm] "SON, 8-Leads, Body 4,00x3,00mm, Pitch 0,80mm, Thermal Pad 0,80x0,20mm, IPC Medium Density"
  rect 1.05x0.3 smd: 1(-1.32,1.2) 2(-1.32,0.4) 3(-1.32,-0.4) 4(-1.32,-1.2) 5(1.32,-1.2) 6(1.32,-0.4) 7(1.32,0.4) 8(1.32,1.2)
  rect 0.2x0.8 smd: 9(0,0.8) 9(0,-0.8)
  silkscreen extent -2.07,-2.16 1.66,2.21, body extent -1.55,-2.05 1.55,2.05, height 0.6
SOTFL50P160X60-3L [mm] "SOTFL, 3-Leads, Body 1.60x1.60mm, Pitch 0.50mm, IPC High Density"
  rect 0.55x0.3 smd: 1(-0.7,0.5) 2(-0.7,-0.5) 3(0.7,0)
  silkscreen extent -0.87,-0.85 0.65,1.08, body extent -0.8,-0.85 0.8,0.85, height 0.6
SW_TACTILE_2.6x3.0MM_4-LEAD [mm] "2.6×3.0mm TACT Switch, without ground connector"
  rect 0.65x0.7 smd: 1(-1.475,0.95) 1(1.475,0.95) 2(-1.475,-0.95) 2(1.475,-0.95)
  silkscreen extent -1.5,-1.3 1.5,1.3, body extent -1.6,-1.3 1.6,1.3, height 0.65
TEMT6200FX01 [mm] "Chip Diode, 2-Leads, Body 2,00x1,25mm, IPC Medium Density"
  rect 1x1.45 smd: C(0.8,0) E(-0.8,0)
  body extent -1,-0.63 1,0.63, height 0.85
TESTPAD-TH [mm]
  round 1.4 hole 0.9: 1(0,0)
TP_SMD_D1.0mm [mm] "Test point - pad 1.0mm"
  round 1 smd paste-5: 1(0,0)
TP_SMD_D1.5mm [mm] "Test point - pad 1.5mm"
  round 1.5 smd paste-5: 1(0,0)
  body extent -0.75,-0.75 0.75,0.75, height 0.05
WEEE_3x4.5mm [mm]
  silkscreen extent -1.47,-2.7 1.47,1.71
XTAL_2012 [mm] "XTAL SMD 2.0 x 1.2 mm"
  rect 0.75x1.4 smd: 1(-0.725,0) 2(0.725,0)
  body extent -1,-0.61 1,0.61, height 0.6

## Part data
0.01 0.02 0.04 1.02 1.03 1.11 1.12 1.13 1.14 2.05 2.06 2.07 GND VDD: library part "Testpoint TH", "Testpoint, through hole", Manufacturer=N.A., Part number NEMS=100500464, Artikkelnr Noca=N.A., Author=rsk, Component Class=Connectors, Component Status=Active, ComponentLink1Description=Datasheet, ComponentLink1URL=N.A., ComponentLink2Description="Supplier link", ComponentLink2URL=N.A., Footprint Doc=TESTPAD-TH, HelpURL=N.A., LatestRevisionDate=2009-12-12, Manufacturer Part Number=N.A., Note=N.A., Pad Count=1, Part Number="Testpoint TH", Part number IPS=N.A., Part number Norautron=N.A., PartId=100500464, Published=2009-12-12, Supplier 1=N.A., Supplier 2=N.A., Supplier Part Number 1=N.A., Supplier Part Number 2=N.A.
A1 A2: library part "Johanson 2450AT18D0100_TE", "2.45 GHz chip antenna", Manufacturer="Johanson Technology", Part number IPS=00000001415, Part number NEMS="100700004, 100700005, 100700006", Part number Norautron=N.A., Supplier Part Number 1=2450AT18D0100E, Artikkelnr Noca=53059035, Author=rsk, Component Class=Antennas, Component Status=Active, ComponentLink1Description=Datasheet, ComponentLink1URL=N.A., ComponentLink2Description="Supplier link", ComponentLink2URL=N.A., Footprint Doc=2450AT18D0100, HelpURL=http://www.johansontechnology.com/datasheets/antennas/2450AT18D0100.pdf, LatestRevisionDate=2025-01-07, Manufacturer Part Number=2450AT18D0100, Note=N.A., Pad Count=4, Part Number="Johanson 2450AT18D0100_TE", PartId=100700006, Published=2016-01-12, Supplier 1=DigiKey, Supplier 2=Mouser, Supplier Part Number 2=609-2450AT18D0100E
Bat1: library part "Bat Holder L-KLS5-CR2032-23-BR", "Bat Holder CR2032 SMD", Manufacturer="KLS Electronic", Manufacturer Part Number=L-KLS5-CR2032-23-BR, Part number IPS=N.A., Part number NEMS=100500651, Artikkelnr Noca=N.A., Author=rsk, Component Class=Connectors, Component Status=Active, ComponentLink1Description=Datasheet, ComponentLink1URL=http://www.klsele.com/admin/product_upload/20151124103736KLS5-CR2032-23-B.pdf, ComponentLink2Description="Supplier link", ComponentLink2URL=N.A., Footprint Doc=CR2032_HOLDER, HelpURL=http://www.klsele.com/products/connectors/Coin-Cell-Holders-Series/4685.html, LatestRevisionDate=2025-09-19, Note="Bat Holder CR2032", Pad Count=2, Part Number="Bat Holder L-KLS5-CR2032-23-BR", Part number Norautron=N.A., PartId=100500651, Published=2019-08-28, Supplier 1=Milexia, Supplier 2=Mouser, Supplier Part Number 1=L-KLS5-CR2032-23-BR, Supplier Part Number 2=614-SMTU2032-LF, System=Connector
Bz1: library part PKMCS0909E4000-R1, "Piezo Buzzer, SMD, 9.0mm x 9.0mm x 1.9mm, 4kHz, 65dB @ 1.5V, <12.5Vp-p", Manufacturer=Murata, Part number IPS=N.A., Part number NEMS=101000026, Supplier Part Number 1=490-9647-1-ND, Artikkelnr Noca=N.A., Author=rsk, Component Class=Transducers, Component Status=Active, ComponentLink1Description=Datasheet, ComponentLink1URL=N.A., ComponentLink2Description="Supplier link", ComponentLink2URL=N.A., Footprint Doc=Buzzer_PKMCS0909, HelpURL=https://www.murata.com/en-global/products/productdetail.aspx?partno=PKMCS0909E4000-R1, LatestRevisionDate=2020-08-04, Manufacturer Part Number=PKMCS0909E4000-R1, Note="1.5 ~ 12.5V", Pad Count=2, Part Number=PKMCS0909E4000-R1, Part number Norautron=N.A., PartId=101000026, Published=2020-08-04, Supplier 1=DigiKey, Supplier 2=Mouser, Supplier Part Number 2=81-PKMCS0909E4000-R1
C1 C2: library part C0201-2µ2-2.5V-X6T-GRM033D80E225ME47D, "Capacitor, Ceramic, 2.2µF 2.5V X6T 0201,±20%", Manufacturer=Murata, Manufacturer Part Number=GRM033D80E225ME47D, Part number IPS=N.A., Part number NEMS=100200527, Supplier Part Number 1=81-GRM033D80E225ME7D, Artikkelnr Noca=N.A., Author=stl1, Component Class=Capacitors, Component Status=Active, ComponentLink1Description=Datasheet, ComponentLink1URL=https://www.murata.com/products/productdetail?partno=GRM033D80E225ME47%23, ComponentLink2Description="Supplier link", ComponentLink2URL=N.A., Footprint Doc=0201, HelpURL=N.A., LatestRevisionDate=2022-02-27, Note="2.5V, 20%, X6T", Pad Count=2, Part Number=C0201-2µ2-2.5V-X6T-GRM033D80E225ME47D, Part number Norautron=N.A., PartId=100200527, Published=2022-02-27, Supplier 1=Mouser, Supplier 2=DigiKey, Supplier Part Number 2=490-18653-1-ND
C3: library part C0402-10µ-6.3V-X5R-GRM155R60J106ME05D, "Capacitor, X5R, ±20%, 6.3V", Manufacturer=Murata, Manufacturer Part Number=GRM155R60J106ME05D, Part number IPS=N.A., Part number NEMS=100200554, Supplier Part Number 1=490-GRM155R60J106ME05DTR-ND, Artikkelnr Noca=N.A., Author=eisk, Component Class=Capacitors, Component Status=Active, ComponentLink1Description=Datasheet, ComponentLink1URL=https://www.murata.com/products/productdetail?partno=GRM155R60J106ME05%23, ComponentLink2Description="Supplier link", ComponentLink2URL=N.A., Footprint Doc=0402, HelpURL=https://www.murata.com/products/productdetail?partno=GRM155R60J106ME05%23, LatestRevisionDate=2023-08-01, Note=6.3V, Pad Count=2, Part Number=C0402-10µ-6.3V-X5R-GRM155R60J106ME05D, Part number Norautron=N.A., PartId=100200554, Published=2023-08-01, Supplier 1=DigiKey, Supplier 2=Mouser, Supplier Part Number 2=81-GRM155C81C225KE1D
C4 C7 C8 C10 C15 C16 C18 C20 C21 C22 C23 C24 C38: library part C0201-100n, "Capacitor, X5R, ±10%, 100nF, 16V", Manufacturer=N.A., Part number IPS="00000001248, 00000002505", Part number NEMS=100200078, Part number Norautron=262071862, Artikkelnr Noca=N.A., Author=rsk, Component Class=Capacitors, Component Status=Active, ComponentLink1Description=Datasheet, ComponentLink1URL=N.A., ComponentLink2Description="Supplier link", ComponentLink2URL=N.A., Footprint Doc=0201, HelpURL=N.A., LatestRevisionDate=2024-06-27, Manufacturer Part Number=N.A., Note=16V, Pad Count=2, Part Number=C0201-100n, PartId=100200078, Published=2014-11-13, Supplier 1=N.A., Supplier 2=N.A., Supplier Part Number 1=N.A., Supplier Part Number 2=N.A.
C5: library part C0201-100p, "Capacitor, NP0, ±2%, 25V", Manufacturer=Murata, Manufacturer Part Number=GRM0335C1E101GA01D, Part number IPS=00000007853, Part number NEMS=100200044, Part number Norautron=N.A., Artikkelnr Noca=N.A., Author=rsk, Component Class=Capacitors, Component Status=Active, ComponentLink1Description=Datasheet, ComponentLink1URL=N.A., ComponentLink2Description="Supplier link", ComponentLink2URL=N.A., Footprint Doc=0201, HelpURL=N.A., LatestRevisionDate=2019-04-16, Note=25V, Pad Count=2, Part Number=C0201-100p, PartId=100200044, Published=2019-04-16, Supplier 1=N.A., Supplier 2=N.A., Supplier Part Number 1=N.A., Supplier Part Number 2=N.A.
C6: library part C0201-1.5p-25V-NP0-GJM0335C1E1R5WB01, "Capacitor, NP0, ±0.05pF, 25V, High Q", Manufacturer=Murata, Manufacturer Part Number=GJM0335C1E1R5WB01, Part number IPS=N.A., Part number NEMS=100200477, Supplier Part Number 1=490-11176-2-ND, Artikkelnr Noca=N.A., Author=masi, Component Class=Capacitors, Component Status=Active, ComponentLink1Description=Datasheet, ComponentLink1URL=https://search.murata.co.jp/Ceramy/image/img/A01X/G101/ENG/GJM0335C1E1R5WB01-01.pdf, ComponentLink2Description="Supplier link", ComponentLink2URL=N.A., Footprint Doc=0201, HelpURL=https://www.murata.com/products/productdetail?partno=GJM0335C1E1R5WB01%23, LatestRevisionDate=2021-06-15, Note=25V, Pad Count=2, Part Number=C0201-1.5p-25V-NP0-GJM0335C1E1R5WB01, Part number Norautron=N.A., PartId=100200477, Published=2021-06-15, Supplier 1=DigiKey, Supplier 2=Mouser, Supplier Part Number 2=81-GJM0335C1E1R5WB1D
C9: library part C0201-2.0p-HQ-Murata, "Capacitor, NP0, ±0.05pF, 25V", Manufacturer=Murata, Manufacturer Part Number=GJM0335C1E2R0WB01, Part number IPS=00000001775, Part number NEMS=100200419, Part number Norautron=N.A., Artikkelnr Noca=N.A., Author=rsk, Component Class=Capacitors, Component Status=Active, ComponentLink1Description=Datasheet, ComponentLink1URL=N.A., ComponentLink2Description="Supplier link", ComponentLink2URL=N.A., Footprint Doc=0201, HelpURL=https://psearch.en.murata.com/capacitor/product/GJM0335C1E2R0WB01%23.html, LatestRevisionDate=2018-10-25, Note=25V, Pad Count=2, Part Number=C0201-2.0p-HQ-Murata, PartId=100200419, Published=2018-10-25, Supplier 1=N.A., Supplier 2=N.A., Supplier Part Number 1=N.A., Supplier Part Number 2=N.A.
C11: library part C0201-0.3p-50V-GRM0335C1HR30BA01, "Capacitor, C0G, ±0.1pF, 50V", Manufacturer=Murata, Manufacturer Part Number=GRM0335C1HR30BA01, Part number IPS=N.A., Part number NEMS=100200650, Supplier Part Number 1=490-6135-2-ND, Artikkelnr Noca=N.A., Author=masi, Component Class=Capacitors, Component Status=Active, ComponentLink1Description=Datasheet, ComponentLink1URL=https://www.murata.com/en-global/products/productdetail?partno=GRM0335C1HR30BA01%23, ComponentLink2Description="Supplier link", ComponentLink2URL=N.A., Footprint Doc=0201, HelpURL=N.A., LatestRevisionDate=2024-01-10, Note=50V, Pad Count=2, Part Number=C0201-0.3p-50V-GRM0335C1HR30BA01, Part number Norautron=N.A., PartId=100200650, Published=2024-01-10, Supplier 1=DigiKey, Supplier 2=Mouser, Supplier Part Number 2=81-GRM0335C1HR30BA1D
C12: library part C0201-18p, "Capacitor, C0G, ±5%, 25V", Manufacturer="Walsin Technology Corporation", Manufacturer Part Number=0201N180J250CT, Part number IPS=00000000862, Part number NEMS=100200035, Part number Norautron=26207023, Supplier Part Number 1=N.A., Artikkelnr Noca=N.A., Author=rsk, Component Class=Capacitors, Component Status=Active, ComponentLink1Description=Datasheet, ComponentLink1URL=N.A., ComponentLink2Description="Supplier link", ComponentLink2URL=N.A., Footprint Doc=0201, HelpURL=N.A., LatestRevisionDate=2020-10-13, Note="Chip Cap 5%", Pad Count=2, Part Number=C0201-18p, PartId=100200035, Published=2014-11-13, Supplier 1=N.A., Supplier 2=N.A., Supplier Part Number 2=N.A.
C13: library part C0201-3.9p, "Chip Cap 0201", Manufacturer=N.A., Part number NEMS=100200024,100200424, Artikkelnr Noca=N.A., Author=rsk, Component Class=Capacitors, Component Status=Active, ComponentLink1Description=Datasheet, ComponentLink1URL=N.A., ComponentLink2Description="Supplier link", ComponentLink2URL=N.A., Footprint Doc=0201, HelpURL=N.A., LatestRevisionDate=2014-11-13, Manufacturer Part Number=N.A., Note="Chip Cap 1%", Pad Count=2, Part Number=C0201-3.9p, Part number IPS=N.A., Part number Norautron=N.A., PartId=100200024, Published=2014-11-13, Supplier 1=N.A., Supplier 2=N.A., Supplier Part Number 1=N.A., Supplier Part Number 2=N.A.
C17 C19: library part C0402-TBD, "Chip Cap 0402", Manufacturer=N.A., Part number NEMS=100200106, Artikkelnr Noca=N.A., Author=rsk, Component Class=Capacitors, Component Status=Active, ComponentLink1Description=Datasheet, ComponentLink1URL=N.A., ComponentLink2Description="Supplier link", ComponentLink2URL=N.A., Footprint Doc=0402, HelpURL=N.A., LatestRevisionDate=2010-12-21, Manufacturer Part Number=N.A., Note="Chip Cap", Pad Count=2, Part Number=C0402-TBD, Part number IPS=N.A., Part number Norautron=N.A., PartId=100200106, Published=2010-12-21, Supplier 1=N.A., Supplier 2=N.A., Supplier Part Number 1=N.A., Supplier Part Number 2=N.A.
C25 C28 C29: library part C0201-47p-25V-NP0-QLCD250Q470G1GV001T, "Capacitor, High Q, Low Loss, C0G/NP0, 25V, ±2%, -55°C ~ 125°C", Manufacturer="Johanson Technology", Manufacturer Part Number=QLCD250Q470G1GV001T, Part number IPS=00000010810, Part number Norautron=N.A., Supplier Part Number 1=712-QLCD250Q470G1GV001TCT-ND, Artikkelnr Noca=N.A., Author=rubr, Component Class=Capacitors, Component Status=Active, ComponentLink1Description=Datasheet, ComponentLink1URL=https://www.johansontechnology.com/search/pn-pdf/QLCD250Q470G1GV001T/, ComponentLink2Description="Supplier link", ComponentLink2URL=https://www.digikey.com/en/products/detail/johanson-technology-inc/QLCD250Q470G1GV001T/1561502, Footprint Doc=0201, HelpURL=https://www.johansontechnology.com/products/rf-capacitors/high-q-multilayer-capacitors/0201-lseries/, LatestRevisionDate=2026-04-13, Note=25V, Pad Count=2, Part Number=C0201-47p-25V-NP0-QLCD250Q470G1GV001T, Published=2026-04-13, Supplier 1=DigiKey, Supplier 2=N.A., Supplier Part Number 2=N.A.
C26: library part C0402-0.8p, "Capacitor, NP0, ±5%", Manufacturer=Murata, Manufacturer Part Number=GRM1555C1HR80WA01D, Part number IPS=00000007782, Part number NEMS=100200116, Part number Norautron=N.A., Supplier Part Number 1=490-6270-1-ND, Artikkelnr Noca=20029147, Author=rsk, Component Class=Capacitors, Component Status=Active, ComponentLink1Description=Datasheet, ComponentLink1URL=https://www.murata.com/~/media/webrenewal/support/library/catalog/products/capacitor/mlcc/c02e.ashx?la=en-us, ComponentLink2Description="Supplier link", ComponentLink2URL=N.A., Footprint Doc=0402, HelpURL=N.A., LatestRevisionDate=2012-11-21, Note=50V, Pad Count=2, Part Number=C0402-0.8p, PartId=100200116, Published=2009-05-08, Supplier 1=DigiKey, Supplier 2=N.A., Supplier Part Number 2=N.A.
C27 C31: library part C0402-N.C., "Not mounted", Manufacturer=N.A., Part number NEMS=100200105, Artikkelnr Noca=N.A., Assembly="Not mounted", Author=rsk, Component Class=Capacitors, Component Status=Active, ComponentLink1Description=Datasheet, ComponentLink1URL=N.A., ComponentLink2Description="Supplier link", ComponentLink2URL=N.A., Footprint Doc=0402, HelpURL=N.A., LatestRevisionDate=2009-05-08, Manufacturer Part Number=N.A., Note="Chip Cap", Pad Count=2, Part Number=C0402-N.C., Part number IPS=N.A., Part number Norautron=N.A., PartId=100200105, Published=2009-05-08, Supplier 1=N.A., Supplier 2=N.A., Supplier Part Number 1=N.A., Supplier Part Number 2=N.A.
C30: library part C0402-1.2p, "Capacitor, NP0, ±0.1pF", Manufacturer=N.A., Part number IPS=00000005410, Part number NEMS=100200119, Artikkelnr Noca=20029157, Author=rsk, Component Class=Capacitors, Component Status=Active, ComponentLink1Description=Datasheet, ComponentLink1URL=N.A., ComponentLink2Description="Supplier link", ComponentLink2URL=N.A., Footprint Doc=0402, HelpURL=N.A., LatestRevisionDate=2011-05-11, Manufacturer Part Number=N.A., Note=50V, Pad Count=2, Part Number=C0402-1.2p, Part number Norautron=N.A., PartId=100200119, Published=2009-05-08, Supplier 1=N.A., Supplier 2=N.A., Supplier Part Number 1=N.A., Supplier Part Number 2=N.A.
C39: library part C0603-47µ, "Capacitor, X5R, ±20%, 6.3V", Manufacturer=N.A., Part number IPS=00000001818, Part number NEMS=100200277, Artikkelnr Noca=N.A., Author=rsk, Component Class=Capacitors, Component Status=Active, ComponentLink1Description=Datasheet, ComponentLink1URL=N.A., ComponentLink2Description="Supplier link", ComponentLink2URL=N.A., Footprint Doc=0603, HelpURL=N.A., LatestRevisionDate=2020-04-28, Manufacturer Part Number=N.A., Note=6.3V, Pad Count=2, Part Number=C0603-47µ, Part number Norautron=N.A., PartId=100200277, Published=2016-04-16, Supplier 1=N.A., Supplier 2=N.A., Supplier Part Number 1=N.A., Supplier Part Number 2=N.A.
C40: library part C0402-6.8p-50V-NP0-GJM1555C1H6R8BB01D, "Capacitor, High Q, Low Loss, C0G/NP0, 50V, ±0.1pF, -55°C ~ 125°C", Manufacturer=Murata, Manufacturer Part Number=GJM1555C1H6R8BB01D, Part number IPS=80000004966, Part number Norautron=N.A., Supplier Part Number 1=490-12599-1-ND, Artikkelnr Noca=N.A., Author=rubr, Component Class=Capacitors, Component Status=Active, ComponentLink1Description=Datasheet, ComponentLink1URL=https://search.murata.co.jp/Ceramy/image/img/A01X/G101/ENG/GJM1555C1H6R8BB01-01.pdf, ComponentLink2Description="Supplier link", ComponentLink2URL=https://www.digikey.com/en/products/detail/murata-electronics/GJM1555C1H6R8BB01D/2593097, Footprint Doc=0402, HelpURL=https://pim.murata.com/en-global/pim/details/?partNum=GJM1555C1H6R8BB01%23, LatestRevisionDate=2026-04-13, Note=50V, Pad Count=2, Part Number=C0402-6.8p-50V-NP0-GJM1555C1H6R8BB01D, Published=2026-04-13, Supplier 1=DigiKey, Supplier 2=N.A., Supplier Part Number 2=N.A.
C41: library part C0402-2.0p-50V-NP0-GJM1555C1H2R0BB01, "Capacitor, High Q, Low Loss, C0G/NP0, 50V, ±0.1pF, -55°C ~ 125°C", Manufacturer=Murata, Manufacturer Part Number=GJM1555C1H2R0BB01, Part number IPS=80000004957, Part number NEMS=100200697, Part number Norautron=N.A., Supplier Part Number 1=490-8091-1-ND, Artikkelnr Noca=N.A., Author=rubr, Component Class=Capacitors, Component Status=Active, ComponentLink1Description=Datasheet, ComponentLink1URL=https://search.murata.co.jp/Ceramy/image/img/A01X/G101/ENG/GJM1555C1H2R0BB01-01.pdf, ComponentLink2Description="Supplier link", ComponentLink2URL=https://www.digikey.com/en/products/detail/murata-electronics/GJM1555C1H2R0BB01D/2592912, Footprint Doc=0402, HelpURL=https://pim.murata.com/en-global/pim/details/?partNum=GJM1555C1H2R0BB01%23, LatestRevisionDate=2026-04-13, Note=50V, Pad Count=2, Part Number=C0402-2.0p-50V-NP0-GJM1555C1H2R0BB01, PartId=100200697, Published=2025-04-23, Supplier 1=DigiKey, Supplier 2=N.A., Supplier Part Number 2=N.A.
C42: library part C0402-1.5p-50V-NP0-GJM1555C1H1R5BB01D, "Capacitor, High Q, Low Loss, C0G/NP0, 50V, ±0.1pF, -55°C ~ 125°C", Manufacturer=Murata, Manufacturer Part Number=GJM1555C1H1R5BB01D, Part number IPS=80000004967, Part number Norautron=N.A., Supplier Part Number 1=490-8087-1-ND, Artikkelnr Noca=N.A., Author=rubr, Component Class=Capacitors, Component Status=Active, ComponentLink1Description=Datasheet, ComponentLink1URL=https://search.murata.co.jp/Ceramy/image/img/A01X/G101/ENG/GJM1555C1H1R5BB01-01.pdf, ComponentLink2Description="Supplier link", ComponentLink2URL=https://www.digikey.com/en/products/detail/murata-electronics/GJM1555C1H1R5BB01D/2592887, Footprint Doc=0402, HelpURL=https://pim.murata.com/en-global/pim/details/?partNum=GJM1555C1H1R5BB01%23, LatestRevisionDate=2026-04-13, Note=50V, Pad Count=2, Part Number=C0402-1.5p-50V-NP0-GJM1555C1H1R5BB01D, Published=2026-04-13, Supplier 1=DigiKey, Supplier 2=N.A., Supplier Part Number 2=N.A.
D1: "Zener Diode Array, 1 Pair, Common Anode, 12V, 265mW, ±5%", Manufacturer=Nexperia, Part number IPS=N.A., Part number NEMS=101300214, Supplier Part Number 1=1727-1585-1-ND, Artikkelnr Noca=N.A., Author=rubr, Component Class=Semiconductors, Component Status=Active, ComponentLink1Description=Datasheet, ComponentLink1URL=https://assets.nexperia.com/documents/data-sheet/BZB984_SER.pdf, ComponentLink2Description="Supplier link", ComponentLink2URL=https://www.digikey.com/en/products/detail/nexperia-usa-inc/BZB984-C12-115/1155439, Footprint Doc=SOT-663, HelpURL=https://www.nexperia.com/product/BZB984-C12, LatestRevisionDate=2025-01-30, Manufacturer Part Number=BZB984-C12,115, Note=N.A., Pad Count=3, Part Number=BZB984-C12,115, Part number Norautron=N.A., PartId=101300214, Published=2025-01-30, Supplier 1=DigiKey, Supplier 2=N.A., Supplier Part Number 2=N.A.
FB1 FB2: library part FB0201-120R@100M-200mA-BLM03AG121SN1D, "Ferrite Bead, 120 Ohm @ 100MHz, 200mA, 500 mOhm Max", Manufacturer=Murata, Manufacturer Part Number=BLM03AG121SN1D, Part number IPS=N.A., Part number NEMS=100300419, Supplier Part Number 1=490-5622-1-ND, Artikkelnr Noca=N.A., Author=stl1, Component Class=Inductors, Component Status=Active, ComponentLink1Description=Datasheet, ComponentLink1URL=https://www.murata.com/en-eu/products/productdetail?partno=BLM03AG121SN1%23, ComponentLink2Description="Supplier link", ComponentLink2URL=N.A., Footprint Doc=0201, HelpURL=N.A., LatestRevisionDate=2022-02-27, Note="Ferrite Bead", Pad Count=2, Part Number=FB0201-120R@100M-200mA-BLM03AG121SN1D, Part number Norautron=N.A., PartId=100300419, Published=2022-02-27, Supplier 1=DigiKey, Supplier 2=Mouser, Supplier Part Number 2=81-BLM03AX121SN1D
Fid1 Fid2 Fid3: library part Fid-Mark, "Fiducial Mark", Manufacturer=N.A., Part number NEMS=100500073, Artikkelnr Noca=N.A., Author=rsk, Component Class=Connectors, Component Status=Active, ComponentLink1Description=Datasheet, ComponentLink1URL=N.A., ComponentLink2Description="Supplier link", ComponentLink2URL=N.A., Footprint Doc=Fiducial, HelpURL=N.A., LatestRevisionDate=2009-12-12, Manufacturer Part Number=N.A., Note=N.A., Pad Count=1, Part Number=Fid-Mark, Part number IPS=N.A., Part number Norautron=N.A., PartId=100500073, Published=2009-12-12, Supplier 1=N.A., Supplier 2=N.A., Supplier Part Number 1=N.A., Supplier Part Number 2=N.A., System=Connector
L1: library part L0603-4µ7-MLZ1608M4R7WT000, "Inductor, 120mA, ±20%, 0.65R", Manufacturer="TDK Corporation", Manufacturer Part Number=MLZ1608M4R7WT000, Part number IPS=N.A., Part number NEMS=100300440, Supplier Part Number 1=445-6390-2-ND, Artikkelnr Noca=N.A., Author=stl1, Component Class=Inductors, Component Status=Active, ComponentLink1Description=Datasheet, ComponentLink1URL=https://product.tdk.com/en/search/inductor/inductor/smd/info?part_no=MLZ1608M4R7WT000, ComponentLink2Description="Supplier link", ComponentLink2URL=N.A., Footprint Doc=0603, HelpURL=N.A., LatestRevisionDate=2023-05-10, Note="Power Inductor ±20%", Pad Count=2, Part Number=L0603-4µ7-MLZ1608M4R7WT000, Part number Norautron=N.A., PartId=100300440, Published=2023-05-10, Supplier 1=DigiKey, Supplier 2=Mouser, Supplier Part Number 2=810-MLZ1608M4R7WT000
L2: library part L0201-2n7-HQ-Murata, "Inductor, 600mA, ±0.1ｎH, 120mOhm", Manufacturer=Murata, Manufacturer Part Number=LQP03HQ2N7B02, Part number IPS=00000001753, Part number NEMS=100300214, Part number Norautron=N.A., Supplier Part Number 1=490-13909-1-ND, Artikkelnr Noca=N.A., Author=rsk, Component Class=Inductors, Component Status=Active, ComponentLink1Description=Datasheet, ComponentLink1URL=https://search.murata.co.jp/Ceramy/image/img/P02/JELF243C-0021.pdf, ComponentLink2Description="Supplier link", ComponentLink2URL=N.A., Footprint Doc=0201, HelpURL=https://psearch.en.murata.com/inductor/product/LQP03HQ2N7B02%23.html, LatestRevisionDate=2018-10-23, Note="-55°C ~ 125°C", Pad Count=2, Part Number=L0201-2n7-HQ-Murata, PartId=100300214, Published=2018-10-23, Supplier 1=DigiKey, Supplier 2=N.A., Supplier Part Number 2=N.A.
L3 L4: library part L0201-3n5-HQ-Murata, "Inductor, 500mA, ±0.1ｎH, 170mOhm", Manufacturer=Murata, Manufacturer Part Number=LQP03HQ3N5B02, Part number IPS=N.A., Part number NEMS=100300222, Supplier Part Number 1=490-13925-1-ND, Artikkelnr Noca=N.A., Author=rsk, Component Class=Inductors, Component Status=Active, ComponentLink1Description=Datasheet, ComponentLink1URL=https://search.murata.co.jp/Ceramy/image/img/P02/JELF243C-0021.pdf, ComponentLink2Description="Supplier link", ComponentLink2URL=N.A., Footprint Doc=0201, HelpURL=https://psearch.en.murata.com/inductor/product/LQP03HQ3N5B02%23.html, LatestRevisionDate=2018-10-23, Note="-55°C ~ 125°C", Pad Count=2, Part Number=L0201-3n5-HQ-Murata, Part number Norautron=N.A., PartId=100300222, Published=2018-10-23, Supplier 1=DigiKey, Supplier 2=N.A., Supplier Part Number 2=N.A.
L6: library part L1008-1m0-15mA-24Ω-LSQBA251818T102K, "Inductor, 15mA, ±10%, 24Ω", Manufacturer="Taiyo Yuden", Manufacturer Part Number=LSQBA251818T102K, Part number IPS=N.A., Part number NEMS=100300509, Supplier Part Number 1=587-LSQBA251818T102KCT-ND, Artikkelnr Noca=N.A., Author=rubr, Component Class=Inductors, Component Status=Active, ComponentLink1Description=Datasheet, ComponentLink1URL=https://ds.yuden.co.jp/TYCOMPAS/or/specSheet?pn=LSQBA251818T102K, ComponentLink2Description="Supplier link", ComponentLink2URL=https://www.digikey.com/en/products/detail/taiyo-yuden/LSQBA251818T102K/16661924, Footprint Doc=1008, HelpURL=https://ds.yuden.co.jp/TYCOMPAS/or/detail?pn=LSQBA251818T102K&u=M, LatestRevisionDate=2025-01-30, Note="-40°C ~ 105°C", Pad Count=2, Part Number=L1008-1m0-15mA-24Ω-LSQBA251818T102K, Part number Norautron=N.A., PartId=100300509, Published=2025-01-30, Supplier 1=DigiKey, Supplier 2=N.A., Supplier Part Number 2=N.A.
L7: library part L0402-2n7-Multilayer_Murata, "Inductor, 800mA, ±2%, 120mΩ", Manufacturer=Murata, Manufacturer Part Number=LQG15HS2N7B02D, Part number IPS=N.A., Part number NEMS=100300445, Supplier Part Number 1=490-LQG15HS2N7B02DTR-ND, Artikkelnr Noca=N.A., Author=hany, Component Class=Inductors, Component Status=Active, ComponentLink1Description=Datasheet, ComponentLink1URL=https://search.murata.co.jp/Ceramy/image/img/P02/JELF243B-0010.pdf, ComponentLink2Description="Supplier link", ComponentLink2URL=N.A., Footprint Doc=0402, HelpURL=https://search.murata.co.jp/Ceramy/image/img/P02/JELF243B-0010.pdf, LatestRevisionDate=2023-06-06, Note="-55°C ~ 125°C", Pad Count=2, Part Number=L0402-2n7-Multilayer_Murata, Part number Norautron=N.A., PartId=100300445, Published=2023-06-06, Supplier 1=DigiKey, Supplier 2=Mouser, Supplier Part Number 2=81-LQG15HS2N7B02D
LABEL1: library part Label_8x8, "PCA version label, stick-on, 8x8mm", Manufacturer="Ellco Etikett", Manufacturer Part Number=A33511-01, Part number IPS=N.A., Part number NEMS=101200025, Artikkelnr Noca=N.A., Assembly="Placed in battery holder", Author=hany, Component Class=Mechanicals, Component Status=Active, ComponentLink1Description=Datasheet, ComponentLink1URL=N.A., ComponentLink2Description="Supplier link", ComponentLink2URL=N.A., Footprint Doc=Label, HelpURL=N.A., LatestRevisionDate=2023-01-05, Note=N.A., Pad Count=0, Part Number=Label_8x8, Part number Norautron=N.A., PartId=101200025, Published=2023-01-05, Supplier 1=N.A., Supplier 2=N.A., Supplier Part Number 1=N.A., Supplier Part Number 2=N.A.
LED1 LED2: library part APHF1608LSEEQBDZGKC, "RGB LED 1.60 mm x 0.80 mm SMD", Manufacturer="Kingbright Company LLC", Part number IPS=00000001254, Part number NEMS=101400123, Part number Norautron=26470023, Supplier Part Number 1=754-2143-1-ND, Artikkelnr Noca=N.A., Author=rsk, Component Class=Optoelectronics, Component Status=Active, ComponentLink1Description=Datasheet, ComponentLink1URL=N.A., ComponentLink2Description="Supplier link", ComponentLink2URL=N.A., Footprint Doc=LED_RGB_0603, HelpURL=http://www.kingbrightusa.com/images/catalog/SPEC/APHF1608LSEEQBDZGKC.pdf, LatestRevisionDate=2017-11-09, Manufacturer Part Number=APHF1608LSEEQBDZGKC, Note=N.A., Pad Count=4, Part Number=APHF1608LSEEQBDZGKC, PartId=101400123, Published=2017-09-18, Supplier 1=DigiKey, Supplier 2=N.A., Supplier Part Number 2=N.A.
LOGO1: library part "WEEE Symbol 3x4.5mm", "WEEE Directive symbol", Manufacturer=N.A., Part number NEMS=101100006, Artikkelnr Noca=N.A., Author=rsk, Component Class=Markings, Component Status=Active, ComponentLink1Description=Datasheet, ComponentLink1URL=N.A., ComponentLink2Description="Supplier link", ComponentLink2URL=N.A., Footprint Doc=WEEE_3x4.5mm, HelpURL=N.A., LatestRevisionDate=2023-03-07, Manufacturer Part Number=N.A., Note=N.A., Pad Count=0, Part Number="WEEE Symbol 3x4.5mm", Part number IPS=N.A., Part number Norautron=N.A., PartId=101100006, Published=2016-09-07, Supplier 1=N.A., Supplier 2=N.A., Supplier Part Number 1=N.A., Supplier Part Number 2=N.A.
LOGO2: library part "Nordic Logo lying", "Nordic logo lying", Manufacturer=N.A., Part number NEMS=101100001, Artikkelnr Noca=N.A., Author=rsk, Component Class=Markings, Component Status=Active, ComponentLink1Description=Datasheet, ComponentLink1URL=N.A., ComponentLink2Description="Supplier link", ComponentLink2URL=N.A., Footprint Doc="Nordic Logo", HelpURL=N.A., LatestRevisionDate=2017-03-20, Manufacturer Part Number=N.A., Note=N.A., Pad Count=0, Part Number="Nordic Logo lying", Part number IPS=N.A., Part number Norautron=N.A., PartId=101100001, Published=2017-09-01, Supplier 1=N.A., Supplier 2=N.A., Supplier Part Number 1=N.A., Supplier Part Number 2=N.A.
LOGO3: library part CE_logo, "CE (Conformité_Européenne) logo", Manufacturer=N.A., Part number NEMS=101100010, Artikkelnr Noca=N.A., Author=daba, Component Class=Markings, Component Status=Active, ComponentLink1Description=Datasheet, ComponentLink1URL=N.A., ComponentLink2Description="Supplier link", ComponentLink2URL=N.A., Footprint Doc=CE_logo, HelpURL=N.A., LatestRevisionDate=2024-11-26, Manufacturer Part Number=N.A., Note=N.A., Pad Count=0, Part Number=CE_logo, Part number IPS=N.A., Part number Norautron=N.A., PartId=101100010, Published=2024-11-26, Supplier 1=N.A., Supplier 2=N.A., Supplier Part Number 1=N.A., Supplier Part Number 2=N.A.